# Altium PCB DC-Motor-Driver-v2.0.PcbDoc (part 4 of 5)
Units mil, origin at the board's own origin, x right, y up, seen from the top; angles counter-clockwise.
Board outline 3074 x 1810 mil, 4 copper layers (Top Layer, Signal 1, Signal 2, Bottom Layer), stack 62.055 mil thick; 232 components, 182 nets, 976 pads, 361 vias.
Unrouted connection lines stored in the file: 36.
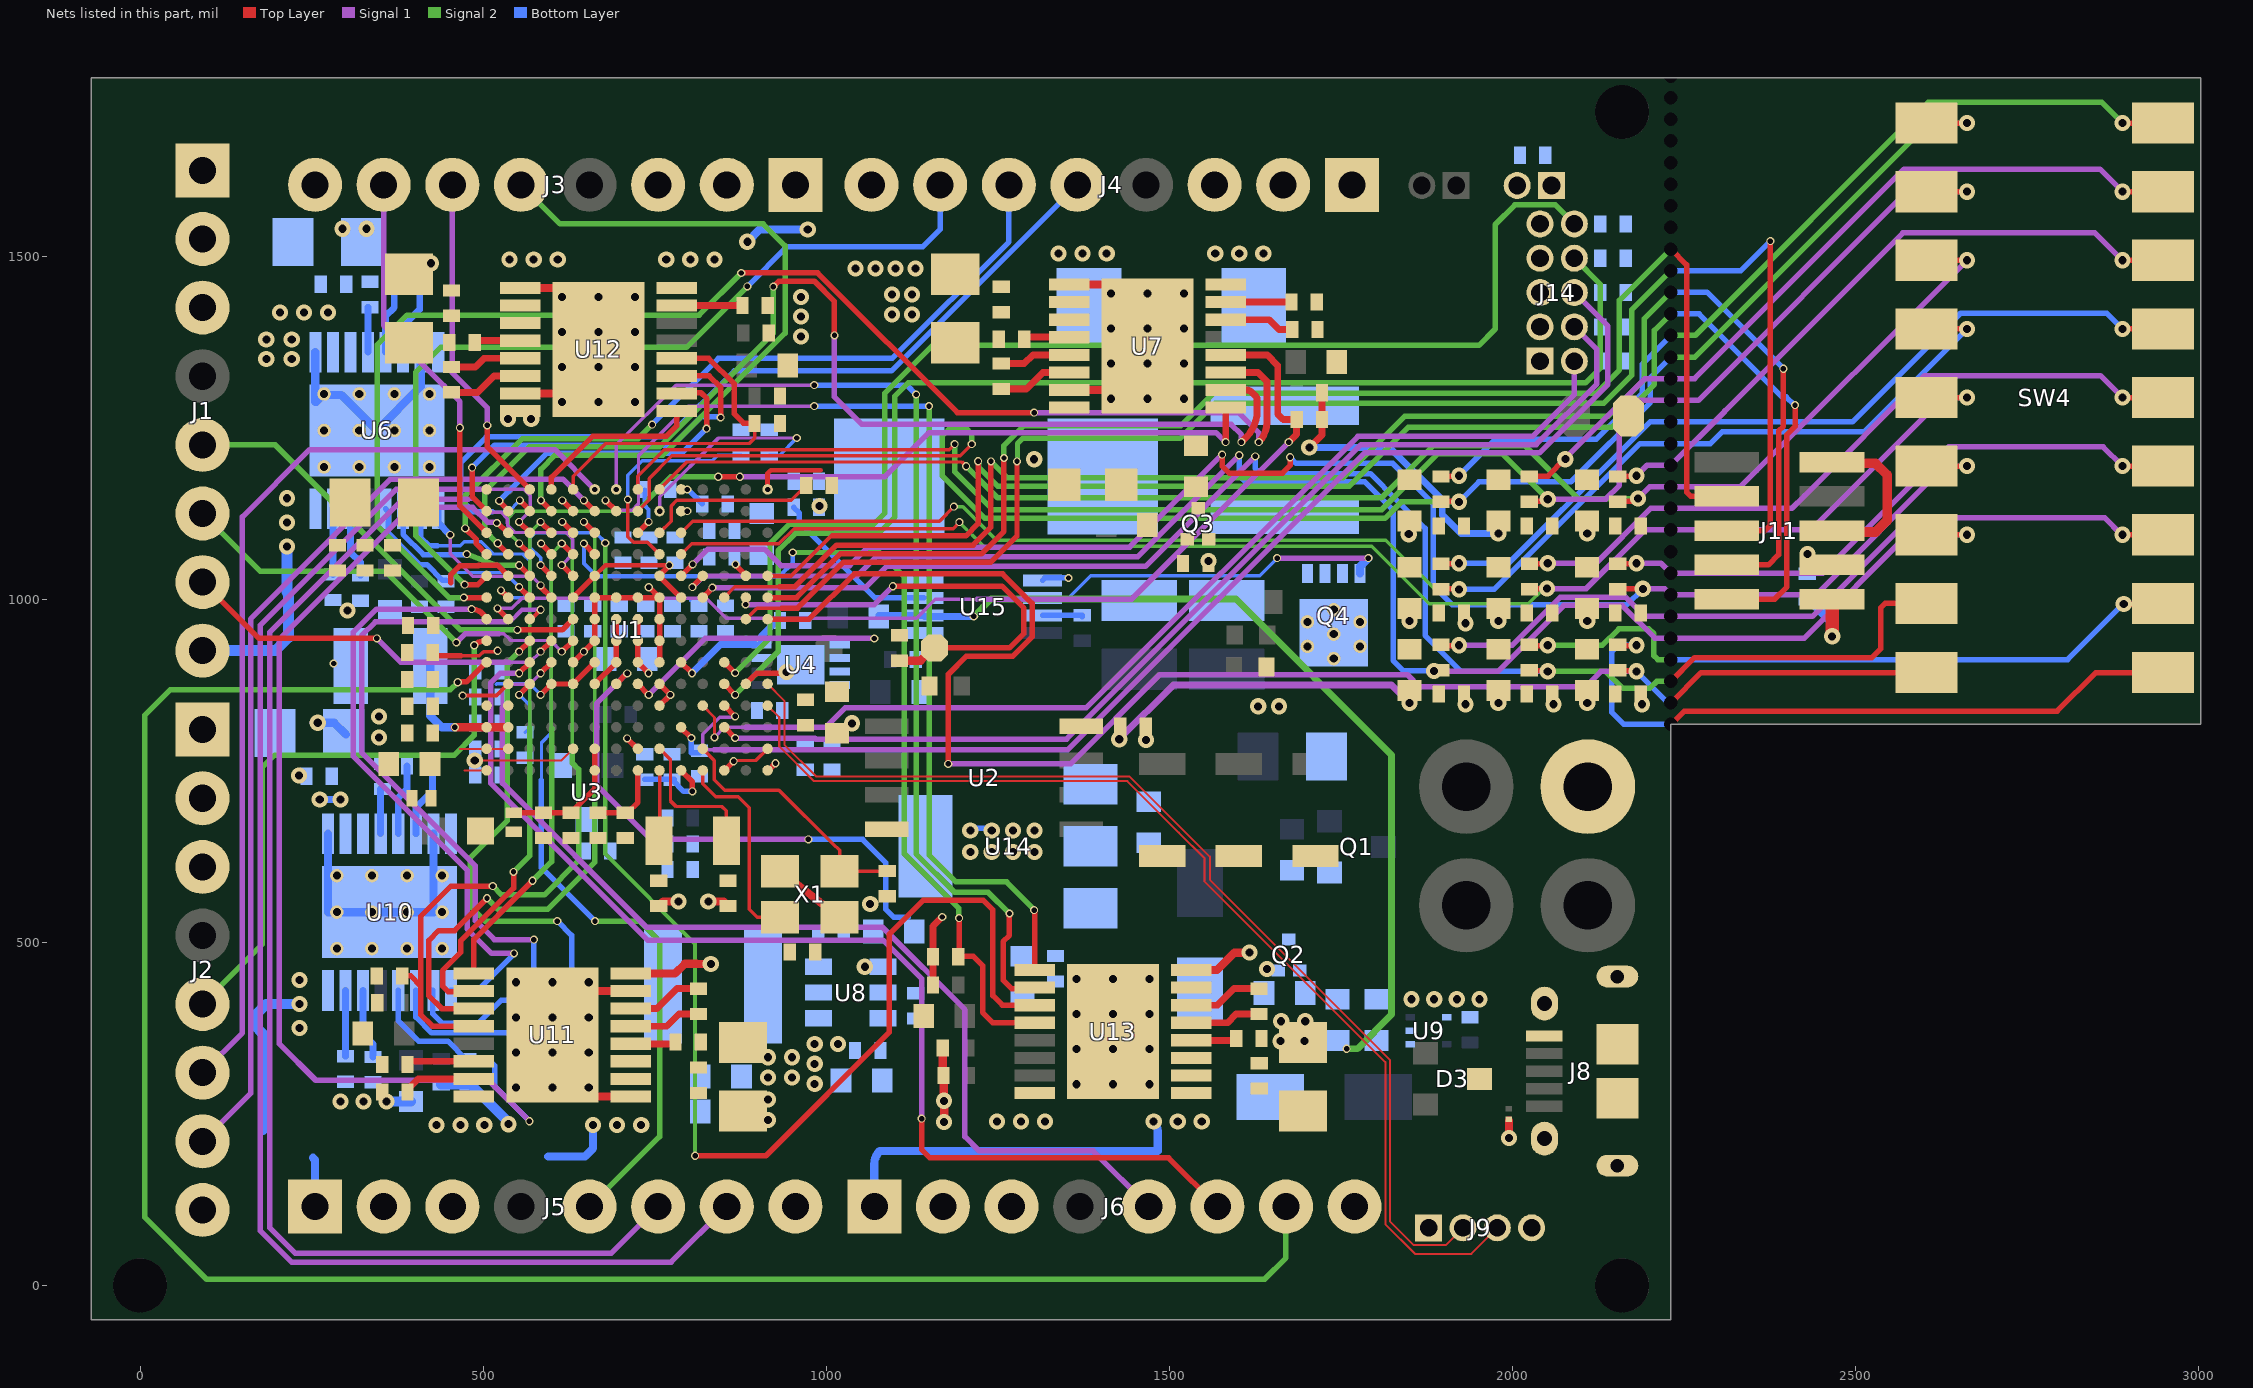
[diagram p4: the nets of this part, all layers, seen from the top]

## Part data (continued)
U6 U7 U10 U11 U12 U13: "DRV8874 H-BRIDGE MOTOR DRIVER", LCSC Part Number=C1855818, Manufacturer="Texas Instruments", Supplier Part Number=595-DRV8874PWPR, ComponentLink1Description=http://www.ti.com/general/docs/suppproductinfo.tsp?distId=10&amp;gotoUrl=http%3A%2F%2Fwww.ti.com%2Flit%2Fgpn%2Fdrv8874&src-supplier=Digikey, ComponentLink1URL=http://www.ti.com/general/docs/suppproductinfo.tsp?distId=10&amp;gotoUrl=http%3A%2F%2Fwww.ti.com%2Flit%2Fgpn%2Fdrv8874&src-supplier=Digikey, Height=1.2mm, Item Type=IC, Length=5mm, Manufacturer Part Number=DRV8874PWPR, Pricing="1=2.68, 10=2.4, 50=2.4, 100=1.93, 1000=1.31, 10000=1.22 (USD)", RoHS=Yes, Stock=13429, Supplier=Mouser, Thickness=1mm, Width=4.4mm
U8: "IC REG BUCK 3.3V 2A TSOT26", LCSC Part Number=C780769, Manufacturer=Diodes, Supplier Part Number=6109504, Category="Voltage Regulators - Switching", ComponentLink1Description=https://www.diodes.com/assets/Datasheets/AP63200-AP63201-AP63203-AP63205.pdf?src-supplier=Digi-Key, ComponentLink1URL=https://www.diodes.com/assets/Datasheets/AP63200-AP63201-AP63203-AP63205.pdf?src-supplier=Digi-Key, Item Type=IC, Manufacturer Part Number=AP63203WU-7, Pricing="3000=0.34, 6000=0.335, 9000=0.33, 12000=0.33, 15000=0.32 (USD)", RoHS=Yes, Stock=3000, Supplier="Future Electronics"
U9: "IC SUPERVISOR 1 CHANNEL 5VSOF", Case/Package=VSOF, LCSC Part Number=C509824, Manufacturer=Rohm, Max Operating Temperature=105°C, Max Power Dissipation=210mW, Max Reset Threshold Voltage=6.09V, Max Supply Current=1.98uA, Max Supply Voltage=10V, Min Operating Temperature=-40°C, Min Reset Threshold Voltage=5.91V, Min Supply Voltage=1.2V, Number of Voltages Monitored=1, Operating Supply Current=900nA, Package Quantity=3000, Supplier Part Number 1=BD4860FVE-CT-ND, Threshold Voltage=6V, Accuracy=1%, Category="Voltage Supervisors", ComponentLink1Description=https://datasheet.ciiva.com/1974/bd48xxg-e-1974994.pdf?src-supplier=Digi-Key, ComponentLink1URL=https://datasheet.ciiva.com/1974/bd48xxg-e-1974994.pdf?src-supplier=Digi-Key, ComponentLink2Description=https://datasheet.ciiva.com/8133/bd48xxg-e-8133113.pdf?src-supplier=Avnet, ComponentLink2URL=https://datasheet.ciiva.com/8133/bd48xxg-e-8133113.pdf?src-supplier=Avnet, Item Type=IC, Lead Free="Lead Free", Manufacturer Part Number=BD4860FVE-TR, Mounting Technology="Surface Mount", Number of Monitored Inputs=1, Packaging="Tape and Reel", Pins=5, Pricing 1="1=0.64000, 10=0.54900, 25=0.51200, 100=0.40960, 250=0.38032, 500=0.32182, 1000=0.24868 (USD)", Reset="Active Low", RoHS=Yes, RoHS Compliant=Yes, Series=BD48xxx, Stock 1=5990, Supplier 1=Digi-Key, Type="Simple Reset/Power-On Reset,Voltage Detector", Watchdog Timer=No
U14: "15V 1.3V @ 800mA Fixed 3.3V SOT-223 Linear Voltage Regulators (LDO) ROHS", LCSC Part Number=C92102, Manufacturer="Diodes Incorporated", Package=SOT-223, ComponentLink1Description=LCSC, ComponentLink1URL=https://lcsc.com/product-detail/Linear-Voltage-Regulators-LDO_Diodes-Incorporated-AZ1117CH-3-3TRG1_C92102.html, Item Type=IC, Manufacturer Part Number=AZ1117CH-3.3TRG1
U15: "IC REG CTRLR BUCK 8VSSOP", LCSC Part Number=C66537, Manufacturer="TI National Semiconductor", Supplier Part Number=926-LM25085MM/NOPB, ComponentLink1Description=https://datasheet.ciiva.com/6598/lm25085-6598301.pdf?src-supplier=Digikey, ComponentLink1URL=https://datasheet.ciiva.com/6598/lm25085-6598301.pdf?src-supplier=Digikey, ComponentLink2Description=https://datasheet.ciiva.com/6598/lm25085-6598310.pdf?src-supplier=Digikey, ComponentLink2URL=https://datasheet.ciiva.com/6598/lm25085-6598310.pdf?src-supplier=Digikey, Item Type=IC, Manufacturer Part Number=LM25085MM/NOPB, Pricing="1=2.42, 10=2.06, 50=2.06, 100=1.75, 1000=1.1, 10000=1.03 (USD)", RoHS=Yes, Stock=2383, Supplier=Mouser
X1: library part X322524MOB4SI, "24MHz SMD Crystal Resonator 12pF ±10ppm ±30ppm -40℃~+85℃ SMD3225-4P Crystals ROHS", LCSC Part Number=C70590, Manufacturer="Yangxing Tech", ComponentLink1Description=LCSC, ComponentLink1URL=https://www.lcsc.com/product-detail/Crystals_Yangxing-Tech-X322524MOB4SI_C70590.html, Item Type=Crystal, Manufacturer Part Number=X322524MOB4SI
X2: library part NX3215SA-32.768K-STD-MUA-8, "CRYSTAL 32.7680KHZ 12.5PF SMD", Case/Package=SMD/SMT, ESR (Equivalent Series Resistance)=70kR, Frequency=32.768kHz, Frequency Tolerance=20ppm, LCSC Part Number=C156245, Load Capacitance=12.5pF, Manufacturer=NDK, Max Operating Temperature=85°C, Min Operating Temperature=-40°C, Package Quantity=1000, Supplier Part Number 1=644-1156-6-ND, ComponentLink1Description=https://media.digikey.com/pdf/Data%20Sheets/NDK%20PDFs/NX3215SA-32.768K-STD-MUA-8.pdf?src-supplier=Digi-Key, ComponentLink1URL=https://media.digikey.com/pdf/Data%20Sheets/NDK%20PDFs/NX3215SA-32.768K-STD-MUA-8.pdf?src-supplier=Digi-Key, ComponentLink2Description=http://www.ndk.com/images/products/catalog/c_NX3215SA-STD-MUA-14_e.pdf?src-supplier=Digi-Key, ComponentLink2URL=http://www.ndk.com/images/products/catalog/c_NX3215SA-STD-MUA-14_e.pdf?src-supplier=Digi-Key, Height=0.035inch, Lead Free="Lead Free", Length=0.126inch, Manufacturer Part Number=NX3215SA-32.768K-STD-MUA-8, Mount="Surface Mount", Number of Pins=2, Packaging="Tape and Reel", Pricing 1="1=0.68, 10=0.602, 50=0.5628, 100=0.4974, 500=0.47124, 1000=0.3927 (USD)", Stock 1=29951, Supplier 1=Digi-Key, Width=0.059inch

## Free pads (board coordinates)
  round 78.74 hole 78.74 unplated: MH(0,0) MH(2160,0) MH(2160,1710)
  round 0 hole 19.68: ""(2231,817.54) ""(2231,849.03) ""(2231,880.53) ""(2231,912.02) ""(2231,943.52) ""(2231,975.02) ""(2231,1006.51) ""(2231,1038.01) ""(2231,1069.5) ""(2231,1101) ""(2231,1132.5) ""(2231,1163.99) ""(2231,1195.49) ""(2231,1226.98) ""(2231,1258.48) ""(2231,1289.98) ""(2231,1321.47) ""(2231,1352.97) ""(2231,1384.46) ""(2231,1415.96) ""(2231,1447.46) ""(2231,1478.95) ""(2231,1510.45) ""(2231,1541.94) ""(2231,1573.44) ""(2231,1604.94) ""(2231,1636.43) ""(2231,1667.93)
  round 0 hole 19.68 unplated: ""(2231,1699.43) ""(2231,1730.92) ""(2231,1762.42)

## Via types
v1: diameter 23.62, hole 11.81, Top Layer to Bottom Layer, tented both sides, 182 vias
v2: diameter 11.81, hole 7.87, Top Layer to Bottom Layer, tented both sides, 179 vias

## Nets (pads, with @x,y where several pads share a name; then routed paths per layer and width w, separated by ;. In a path a pad name is that pad's centre, name@x,y a point inside that pad or via, vN(x,y) a via of type N, cw(c..) or ccw(c..) an arc to the next point about the centre after c; other vN are vias at no path point)
1: pad.@2231,1384.46 R60.1 R62.2 SW4.18 | length 1314.8
  Top Layer w8: R62.2@1896,1179.5 1921.5,1179.5 v1(1922,1180) ; v1(2889,1694) SW4.18@2948,1694
  Signal 2 w8: pad.@2231,1384.46 2266.46,1384.46 2606,1724 2859,1724 v1(2889,1694)
  Bottom Layer w8: v1(1922,1180) 1975,1233 2122,1233 2189,1300 2189,1342.46 pad.@2231,1384.46
2: pad.@2231,1321.47 R59.1 R64.2 SW4.17 | length 1124.3
  Top Layer w8: R64.2@2024.5,1179 2052.26,1179 2052.26,1180.26 2076.19,1204.19 v1(2077.11,1204.19) ; v1(2889,1594) SW4.17@2948,1594
  Signal 1 w8: v1(2077.11,1204.19) 2077.11,1205.61 2192.97,1321.47 pad.@2231,1321.47 2265.47,1321.47 2571,1627 2856,1627 v1(2889,1594)
3: pad.@2231,1195.49 R58.1 R66.2 SW4.16 | length 956.7
  Top Layer w8: R66.2@2155,1179.5 2180.5,1179.5 v1(2181,1180) ; v1(2889,1494) SW4.16@2948,1494
  Signal 1 w8: v1(2181,1180) 2196.49,1195.49 pad.@2231,1195.49 2309.5,1273.99 2309.5,1274.41 2569.09,1534 2849,1534 v1(2889,1494)
3V3: C8.2 C9.2 C10.2 C11.2 C12.2 C13.2 C14.2 C15.2 C16.2 C17.2 C18.2 C19.2 C20.2 C21.2 C22.2 C23.2 C47.2 C48.2 C49.2 C61.2 C62.2 C90.2 C91.2 C92.2 FB2.1 J1.3 J2.3 J3.3 J4.3 J5.3 J6.3 J9.1 J11.1 J13.1 L2.2 LED1.1 pad.@2231,1541.94 pad.@2231,1573.44 pad.@2231,1604.94 R2.1 R7.2 R12.2 R21.2 R22.2 R37.2 R38.2 R46.1 R47.1 R48.1 R49.1 R50.1 R51.1 R52.2 R53.2 R54.2 R55.2 R56.2 R57.2 R58.2 R59.2 R60.2 U1.E6 U1.E9 U1.F5 U1.F10 U1.J6 U1.J10 U1.K4 U1.K5 U1.N14 U1.P12 U2.8 U3.3 U4.8 U6.16 U7.16 U8.1 U10.16 U11.16 U12.16 U13.16 | length 2316.3
  Top Layer w5: 467,917.59 494.49,917.59 500.49,923.59 519.7,923.59 v2(521,924.9) ; v2(865,763.94) 865,765 897.52,765 U1.N14@914.53,782.01
  Top Layer w6: U1.E6@662.49,1034.05 677.94,1049.5 v2(771.41,1049.5)
  Top Layer w8: C23.2@426.58,922.43 431.41,917.59 467,917.59 ; v2(583.78,860.75) 583.78,860.8 599.48,876.5 631.06,876.5 U1.J6@662.56,907.99 ; U1.F5@630.94,1002.89 U1.E6@662.1,1034.05 ; U1.E9@756.98,1033.51 U1.F10@787.94,1002.55 ; U1.E9@756.98,1034.05 757.36,1034.29 757.36,1035.45 v2(771.41,1049.5) ; U1.J10@788.54,907.99 v2(804.29,892.24) ; U1.P12@851.99,750.51 865,763.52 v2(865,763.94)
  Top Layer w10: R38.2@1155.5,438 R50.1@1155.5,479 1155.5,523.5 v2(1169,537) ; v1(1704,1221) 1722.5,1239.5 R47.1@1722.5,1262 R12.2@1722.5,1301
  Top Layer w12: U11.16@714.97,454.57 779.57,454.57 793.78,468.78 810.97,468.78 811.18,468.57 v1(831.81,468.57) ; U13.16@1531.97,459.57 1569.57,459.57 1595,485 v1(1617,485)
  Top Layer w14: U12.16@553.83,1274.43 556,1274.43 U12.16@556,1273
  Top Layer w20: v1(2466,946) J11.1@2466,1000
  Signal 1 w10: v1(1427,796) 1506,875 1824,875 v1(1850,849)
  Bottom Layer w5: 519,876 519.84,876.84 567.69,876.84 v2(583.78,860.75)
  Bottom Layer w10: R49.1@478,293 R49.1@481.5,293 ; v1(537,235) v1@537,237.5 ; v2(804.29,892.24) 846.07,934.03 U4.8@897.06,934.03 ; U4.8@905.69,934.03 905.69,946.71 C91.2@931.17,972.2 ; v1(1704,1221) 1821.19,1221 1897.81,1144.38 1897.81,1123 1924.81,1096 v1(1979.5,1096) ; C47.2@2429.77,1000 C47.2@2433.27,1000
  Bottom Layer w12: v1(885,1521) 903,1539 v1(973,1539)
  Bottom Layer w15: R21.2@439,293 R49.1@478,293 ; R49.1@481.5,293 v1@537,237.5 ; C47.2@2433.27,1000 2466,967.27 v1(2466,946)
  other v1: 1056.23,464.42 1979.5,849 2109,849 2109,968.19 1850,968.5 1979.5,968.5 1848.86,1094.86 2109,1096 1303,1204 536.13,1262.81 570,1262.81
3V3_ENABLE: R8.1 R11.2 U1.K7 U8.2 | length 777.3
  Top Layer w8: U1.K7@694.06,876.45 v2@709.8,892.2
  Signal 1 w8: v2@709.78,892.22 665.45,847.89 665.45,729.3 744.75,650 v2(974,650)
  Bottom Layer w8: v2(974,650) 1053,650 1086.63,616.37 1086.63,576.63 1086.81,576.45 1086.81,548.19 1098.5,536.5 1119.5,536.5
  other v2: 710,892
3V3_LDO: C82.2 D1.1 U14.2 U14.4 | length 28.8
  Bottom Layer w8: v1@1210,666 1236,666 v1@1238,664
  other v1: 1210,631.81 1241.14,631.81 1272.29,631.81 1303.43,631.81 1210,663 1241.14,663 1272.29,663 1303.43,663 1629.5,844 1660,844
4: pad.@2231,1258.48 R57.1 R68.2 SW4.15 | length 1213.2
  Top Layer w8: R68.2@1896,1052 1921.5,1052 v1(1922,1052.5) ; v1(2889,1394) SW4.15@2948,1394
  Bottom Layer w8: v1(1922,1052.5) 1994.53,1052.5 2154.03,1212 2200.51,1258.48 pad.@2231,1258.48 2495.48,1258.48 2639.69,1402.69 2639.69,1403.45 2653.05,1416.81 2653.81,1416.81 2654,1417 2866,1417 v1(2889,1394)
5: pad.@2231,1132.5 R56.1 R70.2 SW4.14 | length 1049.2
  Top Layer w8: R70.2@2025.5,1052 2051,1052 v1(2051.5,1052.5) ; v1(2889,1294) SW4.14@2948,1294
  Signal 1 w8: v1(2051.5,1052.5) 2121.5,1052.5 2201.5,1132.5 pad.@2231,1132.5 2386.79,1132.5 2407.11,1132.5 2425.35,1150.74 2600.62,1326 2857,1326 v1(2889,1294)
6: pad.@2231,1038.01 R55.1 R72.2 SW4.13 | length 887
  Top Layer w8: R72.2@2155,1052 2180.5,1052 v1(2181,1052.5) ; v1(2889,1194) SW4.13@2948,1194
  Signal 1 w8: v1(2181,1052.5) 2216.51,1052.5 pad.@2231,1038.01 2452.01,1038.01 2636,1222 2861,1222 v1(2889,1194)
6V: C50.1 C51.1 C52.2 C53.2 C56.1 C57.1 C65.1 C66.1 C67.2 C68.2 C71.1 C72.1 C73.1 C74.1 C75.2 C76.2 C79.1 C80.1 C88.2 C89.1 J14.1 J14.3 J14.5 J14.7 J14.9 L3.2 R44.1 U6.11 U7.11 U10.11 U11.11 U12.11 U13.11 | length 54
  Bottom Layer w12: v1@253,820 282.99,820 C65.1@299.99,803
  other v1: 915,302.92 950,302.92 915,332.5 950,332.5 1662,356 1697.08,356 1663,385 1698.08,385 347.99,798.5 259,820 347.99,829 990,1136 184,1350 221.08,1350 184,1378.5 221.08,1378.5 1096,1415 1125.08,1415 1096,1444 1125.08,1444 295,1540 330.08,1540
7: pad.@2231,975.02 R54.1 R74.2 SW4.12 | length 1161.8
  Top Layer w8: R74.2@1896,932.5 1921.5,932.5 v1(1922,933) ; v1(2889,1094) SW4.12@2948,1094
  Signal 1 w8: v1(1922,933) 2000.03,933 2070.03,1003 2165,1003 2192.98,975.02 2437.02,975.02 2581,1119 2863,1119 v1@2888,1094
8: pad.@2231,912.02 R53.1 R76.2 SW4.11 | length 1004
  Top Layer w8: R76.2@2025.5,932.5 2051,932.5 v1(2051.5,933) ; v1(2891,993) 2947,993 SW4.11@2948,994
  Signal 2 w8: v1(2051.5,933) 2131,933 2155,957 2199,957 2206,950 2206,918 2211.98,912.02 pad.@2231,912.02
  Bottom Layer w8: pad.@2231,912.02 2809.02,912.02 2890,993 v1(2891,993)
9: pad.@2231,817.54 R52.1 R78.2 SW4.10 | length 996.5
  Top Layer w8: R78.2@2155,932.5 2180.5,932.5 v1(2181,933) ; pad.@2231,817.54 2250.46,837 2794,837 2850.2,893.2 SW4.10@2948,893.2
  Bottom Layer w8: v1(2181,933) 2154,933 2145,924 2145,835 2162.46,817.54 pad.@2231,817.54
BUCK_EN: C64.2 R10.1 R42.1 U9.1 U15.2 | length 1316.9
  Signal 2 w10: v2(1215,975) 1240.14,1000.14 1596.86,1000.14 1824,773 1824,395 1773.91,344.91 v2(1758.43,344.91)
  Bottom Layer w10: R42.1@1076.54,976.41 U15.2@1142,976.41 1143.41,975 v2(1215,975)
BUCKIN: C59.2 C60.2 C83.2 C84.2 D2.1 D5.1 R8.2 U8.3 U14.3
ENABLE_1: U1.E3 U6.3 | length 243.9
  Top Layer w8: v2(552.32,1049.59) 552.39,1049.66 U1.E3@568,1034.05
  Signal 2 w8: v2(476.14,1065.86) 518.43,1049.59 v2(552.32,1049.59)
  Bottom Layer w8: U6.3@383.39,1131.83 383.39,1094.61 412.87,1065.13 436.1,1065.13 464.62,1065.13 475.41,1065.13 v2(476.14,1065.86)
ENABLE_2: U1.H3 U10.3 | length 996.4
  Top Layer w8: v2(552.32,923.74) U1.H3@568.07,939.49
  Signal 2 w8: v2(552.32,923.74) 535,906.42 535,677 481,623 481,553 503,531 v2(608,531)
  Bottom Layer w8: U10.3@401.89,429.83 401.89,391.11 425,368 613,368 629,384 629,510 v2(608,531)
ENABLE_3: U1.B1 U12.3 | length 579.7
  Top Layer w8: v2(484,1191.91) 484,1158.87 484.04,1158.83 484.04,1149.51 U1.B1@505.01,1128.54 ; U12.3@782.17,1325.61 829.39,1325.61 845.98,1309.02 v2(845.98,1264.91)
  Bottom Layer w8: v2(484,1191.91) 516.59,1224.5 654.49,1224.5 776.34,1224.5 817.48,1265.64 833.46,1265.64 845.25,1265.64 v2(845.98,1264.91)
ENABLE_4: U1.F1 U7.3 | length 2061.4
  Top Layer w3: U1.F1@505.01,1002.55 U1.F1@505.08,1002.48
  Top Layer w8: v2(472,1002.55) U1.F1@505.01,1002.55 ; v2(876.12,1475.51) 987.49,1475.51 1191.09,1271.91 1249.44,1271.91 v2(1303,1271.91)
  Top Layer w10: U7.3@1582.17,1330.61 1629.14,1330.61 1642.09,1317.66 1642.09,1257.48 cw(c1601.76,1257.48) v2(1630.28,1228.96)
  Signal 1 w8: v2(1303,1271.91) 1601.09,1271.91 1630.24,1242.76 1630.24,1229 v2(1630.28,1228.96)
  Signal 2 w8: v2(472,1002.55) 450.27,1002.55 426.91,1025.91 346,1106.82 346,1371 389.23,1414.23 814.84,1414.23 v2(876.12,1475.51)
ENABLE_5: U1.C6 U11.3 | length 981.4
  Top Layer w8: U11.3@486.63,403.39 439.66,403.39 421,422.04 421,503 435,517 458.31,517 v2(505.56,564.25) ; v2(646.81,1112.72) U1.C6@662.56,1096.97
  Signal 2 w5: v2(646.81,1112.72) 662.5,1097.03 662.5,778
  Signal 2 w8: v2(505.56,564.25) 521.91,547.91 549.06,547.91 593.91,547.91 662.5,616.5 662.5,778
ENABLE_6: U1.E4 U13.3 | length 2004.4
  Top Layer w8: v2(583.78,1049.72) U1.E4@599.5,1034.05 ; v2(809,189) 912,189 1092.04,369.04 1092.04,512.04 1141,561 1229,561 1242.8,547.2 1242.8,422.24 1256.66,408.39 U13.3@1303.63,408.39
  Signal 2 w6: v2(678,1082) 678,628.49 809,497.49 v2(809,189)
  Bottom Layer w5: v2(583.78,1049.72) 583.78,1060.22 568,1076 568,1089 575.63,1096.63 664.37,1096.63 v2@679,1082
FAULT_1: R46.2 U1.F3 U6.4 | length 291.9
  Top Layer w8: v2(552.32,1017.86) 552.5,1017.86 567.89,1002.48 U1.F3@568.07,1002.48
  Bottom Layer w5: R46.2@446,1026 449.5,1026 462.5,1039 531.19,1039 v2(552.32,1017.86)
  Bottom Layer w8: U6.4@357.8,1131.83 361.66,1127.96 361.66,1096.34 394,1064 407.5,1050.5 418,1050.5 441,1027.5 R46.2@445.38,1027.5
FAULT_2: R49.2 U1.C2 U10.4 | length 1741.6
  Top Layer w3: U1.C2@536.5,1097.04 U1.C2@536.57,1096.97
  Top Layer w8: v2(519.94,1111.2) 520.97,1111.2 U1.C2@535.14,1097.04
  Signal 1 w8: v2(519.94,1111.2) 519.21,1111.93 506.76,1111.93 484.69,1134 395,1134 203,942 203,352 256,299 507.64,299 v2(567.31,239.33)
  Bottom Layer w8: U10.4@376.3,429.83 376.3,385.7 406,356 448.5,356 474.5,330 507,330 517,320 517,289.64 v2(567.31,239.33)
FAULT_3: R51.2 U1.A5 U12.4 | length 505.1
  Top Layer w5: U1.A5@631.06,1159.96 631.06,1179.27 678.8,1227 888,1227 896,1235 R51.2@896,1254
  Top Layer w8: U12.4@782.17,1351.2 828.57,1351.2 866,1313.77 866,1270 879.19,1256.81 892.19,1256.81 R51.2@895,1254
FAULT_4: R47.2 U1.G2 U7.4 | length 1520.8
  Top Layer w8: v2(520.83,986.73) U1.G2@536.5,971.06
  Top Layer w10: U7.4@1582.17,1356.2 1642.8,1356.2 1658,1341 1658,1270 1666,1262 R47.2@1685.5,1262 1685.5,1240.42 v2@1674.05,1228.97
  Signal 1 w5: v2(520.83,986.73) 541.73,986.73 556.59,1001.59 825.41,1001.59 854.5,972.5 1131.5,972.5 1159.14,1000.14 1220,1000.14
  Signal 1 w8: 1220,1000.14 1445.22,1000.14 v2@1673.55,1228.47
  other v2: 1674.05,1228.96
FAULT_5: R48.2 U1.C5 U11.4 | length 1060.7
  Top Layer w8: R48.2@382,451 394.5,451 409,436.5 ; U11.4@486.63,377.8 426,377.8 409,394.8 409,436.5 ; v2(514,582) 453.04,582 409,537.96 409,436.5 ; v2(615.32,1112.72) U1.C5@630.99,1097.04
  Signal 2 w5: v2(615.32,1112.72) 630,1098.03 630,780.94
  Signal 2 w8: v2(514,582) 526.73,569.27 589.3,569.27 639,618.97 639,752 630,761 630,780.94
FAULT_6: R50.2 U1.D6 U13.4 | length 1342.8
  Top Layer w8: v2(646.81,1081.22) U1.D6@662.49,1065.54 ; v2(1193.66,535.26) 1193.66,480.16 R50.2@1192.5,479 1192.75,479.25 1193.5,480 1214,480 1227.8,466.2 1227.8,398 1243,382.8 U13.4@1303.63,382.8
  Signal 2 w8: v2(951.16,1068.15) 1008.18,1068.15 1077.88,1068.15 1113.91,1032.13 1113.91,629.09 1193,550 1193,535.31 1193.61,535.31 v2(1193.66,535.26)
  Bottom Layer w6: v2(646.81,1081.22) 646.81,1052.19 665.41,1033.59 797.1,1033.59 931.59,1033.59 951.16,1053.16 v2(951.16,1068.15)
FB: C88.1 R44.2 R45.2 U15.3 | length 252.1
  Bottom Layer w8: R44.2@952.5,1134 961,1125.5 961,1112 1071,1002 U15.3@1142,1002
FSR1: J14.2 R31.2 U1.L11 | length 1561.9
  Top Layer w4: U1.L11@820.04,845 837.2,827.84 v2(837.2,798.74)
  Signal 1 w5: v2@837.2,799.17 851.54,813.5 883,813.5
  Signal 1 w8: 883,813.5 999.55,813.5 1028.05,842 1379.26,842 1774.69,1237.43 2029.49,1237.43 2090.2,1298.14 J14.2@2090.2,1347
FSR2: J14.4 R30.2 U1.M12 | length 1589.7
  Top Layer w8: U1.M12@851.54,813.5 v2(867.28,797.76)
  Signal 1 w8: v2(867.28,797.76) 983.36,797.76 984.93,796.19 1350.42,796.19 1779.66,1225.43 2034.46,1225.43 2123,1313.97 2123,1364.2 J14.4@2090.2,1397
FSR3: J14.6 R29.2 U1.L12 | length 1791.8
  Top Layer w8: U1.L12@851.54,845 v2(867.28,829.25)
  Signal 1 w5: 837,780.85 827.94,780.85 820,788.8 820,803.33 844.62,827.95 865.98,827.95 v2(867.28,829.25)
  Signal 1 w8: 837,780.85 1352.05,780.85 1784.63,1213.43 2039.43,1213.43 2139,1313 2139,1398.2 J14.6@2090.2,1447
FSR4: J14.8 R28.2 U1.K12 | length 1845.7
  Top Layer w8: U1.K12@851.54,876.5 v2(867.28,860.75)
  Signal 2 w8: v2(867.28,860.75) 930.03,923.49 930.03,1069 930.03,1070.93 954.99,1095.88 1075.88,1095.88 1100,1120 1100,1296 1119.31,1315.31 2106.34,1315.31 2128.31,1337.28 2128.31,1458.89 J14.8@2090.2,1497
FSR5: J14.10 R27.2 U1.J12 | length 1811.3
  Top Layer w3: U1.J12@851.54,907.99 U1.J12@851.69,907.99 ; v2@867.13,892.56 v2(867.28,892.56)
  Top Layer w8: U1.J12@851.69,907.99 v2@867.13,892.56
  Signal 2 w8: v2(867.28,892.56) 918.03,943.3 918.03,1081 946.03,1109 1069,1109 1085,1125 1085,1300 1155,1370 1951,1370 1975,1394 1975,1546 2003.69,1574.68 2062.52,1574.68 J14.10@2090.2,1547
GND: C1.1 C2.1 C3.1 C4.1 C5.1 C6.1 C7.1 C8.1 C9.1 C10.1 C11.1 C12.1 C13.1 C14.1 C15.1 C16.1 C17.1 C18.1 C19.1 C20.1 C21.1 C22.1 C23.1 C24.1 C25.2 C26.1 C27.1 C28.1 C29.2 C30.1 C31.1 C32.1 C33.1 C34.1 C35.1 C36.1 C37.1 C38.1 C39.2 C40.2 C41.1 C42.2 C43.2 C44.1 C45.1 C46.1 C47.1 C48.1 C49.1 C50.2 C51.2 C52.1 C53.1 C59.1 C60.1 C61.1 C62.1 C63.1 C64.1 C65.2 C66.2 C67.1 C68.1 C73.2 C74.2 C75.1 C76.1 C82.1 C83.1 C84.1 C86.1 C87.1 C89.2 C90.1 C91.1 C92.1 D3.3 D4.1 D8.2 J1.2 J2.2 J3.2 J4.2 J5.2 J6.2 J7.2 J8.5 J8.MP1 J8.MP2 J8.S1 J8.S2 J8.S3 J8.S4 J9.4 J11.3 J11.5 J11.9 J13.2 pad.@2231,1636.43 pad.@2231,1667.93 Q2.2 Q3.2 R3.2 R4.2 R5.2 R6.2 R11.1 R13.1 R14.1 R15.2 R16.2 R17.2 R18.1 R19.2 R23.1 R24.1 R27.1 R28.1 R29.1 R30.1 R31.1 R32.2 R33.2 R34.2 R35.2 R36.2 R39.1 R40.1 R45.1 R61.1 R63.1 R65.1 R67.1 R69.1 R71.1 R73.1 R75.1 R77.1 R79.1 R80.1 R81.1 R82.1 R83.1 R84.2 SW1.2 SW2.2 SW3.2 TP1.2 U1.A1 U1.A14 U1.B5 U1.B10 U1.E2 U1.E13 U1.G7 U1.G8 U1.H7 U1.H8 U1.J7 U1.J8 U1.K2 U1.K6 U1.K9 U1.K13 U1.L9 U1.N1 U1.N2 U1.N5 U1.N8 U1.P1 U1.P14 U2.4 U3.1 U4.1 U4.2 U4.3 U4.4 U4.7 U4.9 U6.9 U6.15 U6.17 U7.9 U7.15 U7.17 U8.4 U9.2 U9.4 U10.9 U10.15 U10.17 U11.9 U11.15 U11.17 U12.9 U12.15 U12.17 U13.9 U13.15 U13.17 U14.1 U15.4 X1.2 X1.4 | length 3093.6
  Top Layer w3: 465.49,782.01 U1.N2@536.57,782.01 ; 472.89,750.51 U1.P1@505.08,750.51 ; v1(487.78,765) 614.06,765 U1.N5@631.06,782.01 ; U1.B10@788.47,1128.54 v2(797.47,1128.54)
  Top Layer w6: v2@470.09,857.67 472.17,859.75 519.69,859.75 U1.K2@536.5,876.57
  Top Layer w7: v2(914.46,1160.03) 914.46,1183.46 919,1188 992,1188
  Top Layer w8: 452.86,1023.86 452.86,1035.86 465.96,1048.96 493.01,1048.96 493.78,1049.72 520.83,1049.72 U1.E2@536.57,1033.98 ; U1.A1@504.92,1160.12 U1.A1@505.01,1160.03 ; v2(615.32,1144.21) U1.B5@631.06,1128.46 ; U1.K6@662.56,876.5 694.06,907.99 U1.G7@694.06,970.98 ; v2(709.8,797.17) U1.N8@725.55,781.42 ; U1.G8@725.55,970.98 725.55,907.99 725.55,907.82 740.96,892.42 v2(740.96,892.24) ; U1.L9@756.98,845.07 v2@772.72,860.82 ; U1.K9@757.05,876.5 v2(772.8,860.75) ; v2(867.77,1050.81) 867.77,1050.02 882.96,1034.83 U1.E13@882.96,1034.05 ; U1.K13@882.96,876.57 891.39,885 898.78,892.39 940.39,892.39 v1(942,894) ; U1.P14@914.98,750.51 915.51,750.51 v2(926,761)
  Top Layer w12: U12.15@553.83,1300.02 668,1300.02 U12.17@668,1338.41 U12.17@668,1364 U12.17@668,1389.59 U12.17@668,1440.77 668,1453.57 U12.9@553.83,1453.57 ; U11.17@600.8,365 664.78,428.98 U11.15@714.97,428.98 ; U11.17@632,275.43 U11.9@714.97,275.43 ; C42.2@756,553 762.35,559.35 v1(784.85,559.35) ; v1(828.15,559.35) 850.65,559.35 C43.2@857,553 ; X1.2@932.77,603.46 X1.4@1019.39,536.54 ; R36.2@1169.8,346 1169.8,306.02 1171.31,304.52 1171.31,269.51 v1(1171.81,269) v1(1171.81,238) ; U7.15@1353.83,1305.02 U7.17@1468,1305.02 ; U7.9@1353.83,1458.57 1468,1458.57 U7.17@1468,1445.77 ; v1@1995,213 D4.1@1995,240
  Top Layer w14: J11.5@2457,1098 2529.46,1098 2546,1114.54 2546,1181.46 2529.46,1198 J11.9@2457,1198
  Bottom Layer w12: U6.9@255.43,1360.17 255.43,1288 257.08,1288 U6.17@268.23,1299.15 ; U6.17@268.23,1297.73 293.27,1297.73 U6.17@345,1246 408.98,1309.98 U6.15@408.98,1360.17 ; U10.9@273.93,658.17 273.93,544 U10.17@286.73,544 U10.17@337.91,544 U10.17@363.5,544 U10.17@389.09,544 427.48,544 U10.15@427.48,658.17
  Bottom Layer w15: v1(359,268) R23.1@394.5,268
  other v1: 1995,215 915,241 292,268 325.5,268 915,271 983.16,293.84 983.16,322.92 983.16,352 1017,352 1853,417 1886,417 1919,417 1952,417 1642.49,461.04 1064,556 231.81,743 1466,794.88 1037.5,819.19 1931.5,847 2060,847 2189,847 1931.5,965 302.19,983.51 1557,1055.81 2430,1066 963,1382.84 963,1411.92 963,1440.7 1042.84,1482 1071.92,1482 1101,1482 1130.08,1482 424,1489.76
  other v2: 470.09,859.67
GPIO_AD_B0_04: pad.@2231,880.53 R75.2 R76.1 SW4.8 U1.F11 | length 2222
  Top Layer w8: U1.F11@819.97,1002.55 v2@830.42,1013 ; v2@831,1014 v2(834,1017) ; R76.1@2025.5,895.5 2051,895.5 v1(2051.5,895) ; pad.@2231,880.53 2265.47,915 2524,915 2537,928 2537,988 2543,994 SW4.8@2603.5,994
  Signal 1 w8: v2(834,1017) 1057,1017 1088,1048 1465,1048 v2(1625.15,1208.15)
  Signal 2 w8: v1(2051.5,895) 2136,895 2161,870 2200,870 2210.53,880.53 pad.@2231,880.53
  Bottom Layer w8: v2(1625.15,1208.15) 1625.15,1190.85 1633,1183 1792.99,1183 1831.76,1144.22 1872.81,1103.18 1872.81,947.19 1925,895 v1(2051.5,895)
GPIO_AD_B0_05: pad.@2231,849.03 R77.2 R78.1 SW4.9 U1.G14 | length 2314.9
  Top Layer w8: U1.G14@914.46,971.06 975.06,971.06 1041,1037 1257,1037 1300,994 1300,945.03 1271.97,917 1204.22,917 1177.81,890.59 v2(1177.81,760) ; R78.1@2155,895.5 2180.5,895.5 v1(2181,895) ; pad.@2231,849.03 2275.17,893.2 SW4.9@2603.5,893.2
  Signal 1 w8: v2(1177.81,760) 1356,760 1486,890 1847,890 1864.81,872.19 2106.19,872.19 2129,895 v1(2181,895)
  Bottom Layer w8: v1(2181,895) 2226.97,849.03 pad.@2231,849.03
GPIO_AD_B0_08: R84.1 TP2.1 U1.F13 | length 675.5
  Top Layer w8: v2(882.53,992.32) 882.96,992.75 U1.F13@882.96,1002.55 ; v2(1097,1019) 1256,1019 1288,987 1288,950 1267,929 TP2.1@1158,929 TP2.1@1156.13,929
  Top Layer w12: R84.1@1107,910.5 1137.63,910.5 TP2.1@1156.13,929
  Signal 1 w8: v2(882.53,992.32) 882.53,992.11 883,991.64 883.32,991.32 884.12,992.12 1070.12,992.12 v2(1097,1019)
GPIO_B0_04: R79.2 U1.C8 | length 71.9
  Top Layer w8: U1.C8@725.48,1097.04 v2(741.23,1112.79)
  Bottom Layer w6: R79.2@735.5,1160 735.5,1136.5 741.23,1130.77 v2(741.23,1112.79)
GPIO_B0_05: pad.@2231,1352.97 R61.2 R62.1 SW4.1 U1.B8 | length 2531.2
  Top Layer w5: U1.B8@725.48,1128.54 742,1145.06 742,1176 775,1209 1195,1209 v2(1212,1226)
  Top Layer w8: R62.1@1896,1142.5 1921.5,1142.5 v1(1922,1142) ; SW4.1@2603.5,1694 v1(2662.5,1694)
  Signal 2 w8: v2(1212,1226) 1212,1241 1206,1247 1178,1247 1169,1238 1169,1180.18 1231.18,1118 1814,1118 1838,1142 v1(1922,1142) ; pad.@2231,1352.97 2265.97,1352.97 2607,1694 v1(2662.5,1694)
  Bottom Layer w8: v1(1922,1142) 1951,1171 2085,1171 2201,1287 2201,1322.97 pad.@2231,1352.97
GPIO_B0_06: pad.@2231,1289.98 R63.2 R64.1 SW4.2 U1.A8 | length 2429.1
  Top Layer w5: U1.A8@725.48,1160.03 725.48,1179.48 764,1218 1179,1218 v2(1187,1226)
  Top Layer w8: R64.1@2025.5,1142.5 2051,1142.5 2051,1145.31 v1(2051.5,1145.81) ; SW4.2@2603.5,1594 v1(2662.5,1594)
  Signal 1 w8: v1(2051.5,1145.81) 2135.81,1145.81 2156,1166 2156,1261 2184.98,1289.98 pad.@2231,1289.98 2270.98,1289.98 2575,1594 v1(2662.5,1594)
  Signal 2 w8: v2(1187,1226) 1187,1186.09 1242.51,1130.58 1809.58,1130.58 1891,1212 1985.31,1212 v1(2051.5,1145.81)
GPIO_B0_07: pad.@2231,1163.99 R65.2 R66.1 SW4.3 U1.A9 | length 2241.7
  Top Layer w5: U1.A9@756.98,1160.03 796.94,1200 1197.82,1200 v2(1203.91,1193.91)
  Top Layer w8: R66.1@2155,1142.5 2177.5,1142.5 2182.84,1147.84 v1@2184,1146.69 ; SW4.3@2603.5,1494 v1(2662.5,1494)
  Signal 1 w8: v1(2183,1146.69) 2200.3,1163.99 pad.@2231,1163.99 2332.49,1163.99 v1(2662.5,1494)
  Signal 2 w8: v2(1203.91,1193.91) 1249.86,1147.95 1809.19,1147.95 1885.24,1224 2018,1224 2095.31,1146.69 v1(2183,1146.69)
GPIO_B0_08: R80.2 U1.B9 | length 306.4
  Signal 1 w5: v2(757.13,1128.54) 757.6,1129 757.6,1149.6 843,1235 892.58,1235 v2(957,1235)
  Bottom Layer w5: R80.2@917,1210 932,1210 v2(957,1235)
GPIO_B0_09: R81.2 U1.C9 | length 255.4
  Top Layer w5: U1.C9@756.98,1097.04 773.94,1114 773.94,1135.94 782,1144 949,1144 R81.2@971,1166
GPIO_B0_10: R82.2 U1.D9 | length 323.6
  Top Layer w5: v2(711,1145.41) 711,1091 719.14,1082.86 731.35,1082.86 731.49,1083 739.52,1083 U1.D9@756.98,1065.54
  Bottom Layer w5: v2(711,1145.41) 711,1181 732,1202 834,1202 842,1210 R82.2@876,1210
GPIO_B0_11: R83.2 U1.A10 | length 38.7
  Top Layer w8: U1.A10@788.47,1160.03 v2(797.47,1160.03)
  Bottom Layer w8: v2@798.47,1160.03 R83.2@819.5,1139
GPIO_B0_12: pad.@2231,1226.98 R67.2 R68.1 SW4.4 U1.C10 | length 2182.4
  Top Layer w5: U1.C10@788.47,1097.04 805.43,1114 1165,1114 v2(1186,1135)
  Top Layer w8: R68.1@1896,1015 1921.5,1015 v1(1922,1014.5) ; SW4.4@2603.5,1394 v1(2662.5,1394)
  Signal 2 w5: v2(1186,1135) 1199.33,1135 1248.65,1085.69 1438.58,1085.69 1439.01,1086.12 1815.6,1086.12 1887.22,1014.5 v1(1922,1014.5)
  Bottom Layer w8: v1(1922,1014.5) 1973.5,1014.5 2185.98,1226.98 2288.55,1226.98 2305.45,1243.89 2512.39,1243.89 v1(2662.5,1394)
GPIO_B0_13: pad.@2231,1101 R69.2 R70.1 SW4.5 U1.D10 | length 2153.7
  Top Layer w5: U1.D10@788.47,1065.54 803.93,1081 931.07,1081 953.07,1103 1185,1103 1194,1112 v2(1194,1112.41)
  Top Layer w8: R70.1@2025.5,1015 v1@2050.38,1015 ; v1(2050.38,1015.61) v1@2050.38,1015 ; v1@2051,1015 v1@2050.38,1015 ; SW4.5@2603.5,1294 v1(2662.5,1294)
  Signal 1 w8: v1(2050.38,1015.61) 2107.61,1015.61 2193,1101 pad.@2231,1101 2435,1101 2628,1294 v1(2662.5,1294)
  Signal 2 w5: v2(1194,1112.41) 1229.54,1076.87 1231,1075.41 1235.14,1075.41 1319.17,1076.69 cw(c1319.25,1071.69) 1319.25,1076.69 1442.3,1076.69 1442.74,1077.12 1794.85,1077.12 1878.79,993.19 2022.92,993.19 2045.35,1015.61 v1(2050.38,1015.61)
GPIO_B0_14: pad.@2231,1006.51 R71.2 R72.1 SW4.6 U1.E10 | length 2349.6
  Top Layer w8: U1.E10@788.79,1036.05 790.41,1036.05 v2(805.18,1050.81) ; v2(1577,1210.87) 1577,1194 1587,1184 1665,1184 1676,1195 v2(1676,1207.01) ; R72.1@2155,1015 2180.5,1015 2184.69,1019.19 v1@2190.04,1019.19 ; SW4.6@2603.5,1194 v1(2662.5,1194)
  Signal 1 w8: v2(805.18,1050.81) 827.42,1073.06 909.97,1073.06 934.03,1049 1034,1049 1061,1076 1442.13,1076 v2(1577,1210.87) ; v1(2190.04,1015.19) 2222.32,1015.19 pad.@2231,1006.51 2442.51,1006.51 2630,1194 v1(2662.5,1194)
  Bottom Layer w8: v2(1676,1207.01) 1684.82,1198.19 1825.62,1198.19 1884.81,1138.99 1884.81,1019.43 1912.55,991.69 2166.54,991.69 v1(2190.04,1015.19)
GPIO_B0_15: pad.@2231,943.52 R73.2 R74.1 SW4.7 U1.E11 | length 2427.1
  Top Layer w8: v2(805,1017.69) 805,1018.38 819.97,1033.35 U1.E11@819.97,1034.05 ; v1(1885.79,895.5) R74.1@1896,895.5 ; SW4.7@2603.5,1094 v1(2662.5,1094)
  Signal 1 w8: v2(805,1017.69) 821.22,1033.91 1044.91,1033.91 1073,1062 1454,1062 v2(1601.84,1209.84) v2@1601.93,1209.93 ; v1(1885.79,895.5) 1885.79,895 1979,895 2075,991 2160.03,991 2207.51,943.52 pad.@2231,943.52 2425.35,943.52 2575.83,1094 v1(2662.5,1094)
  Bottom Layer w8: v2(1601.84,1209.84) 1601.84,1180.16 1611,1171 1785,1171 1826,1130 1826,911 1841.5,895.5 v1(1885.79,895.5)
JTAG_TCK/SWD_CLK: J11.4 pad.@2231,1447.46 U1.F12 | length 2257.9
  Top Layer w5: U1.F12@851.46,1002.55 866.87,1017.96 932.31,1017.96
  Top Layer w8: 932.31,1018 954,1018 1015,1079 1214,1079 1240,1105 1240,1199.12 1240.11,1199.24 v2(1240.11,1200.89) ; J11.4@2312.46,1050 2373,1050 2388.09,1065.09 2388.09,1245.07 2395,1251.97 v2(2395,1336)
  Signal 2 w8: v2(1240.11,1200.89) 1264.09,1176.91 1753.16,1176.91 1843.26,1267 2139.79,1267 2192,1319.21 2192,1408.46 pad.@2231,1447.46
  Bottom Layer w8: pad.@2231,1447.46 2283.54,1447.46 v2(2395,1336)
JTAG_TDI: J11.8 pad.@2231,1510.45 U1.F14 | length 2084.4
  Top Layer w8: U1.F14@914.53,1002.48 956.86,1002.48 1020.38,1066 1226,1066 1259,1099 v2(1259,1205.91) ; pad.@2231,1510.45 2254,1487.45 2254,1156 2260,1150 J11.8@2312.46,1150
  Signal 2 w8: v2(1259,1205.91) 1259,1223.97 1288.03,1253 1517,1253 1564,1300 2121.88,1300 2156,1334.12 2156,1435.45 pad.@2231,1510.45
JTAG_TDO: J11.6 pad.@2231,1478.95 U1.G13 | length 2336.4
  Top Layer w5: U1.G13@883.03,970.98 899.05,987 935,987
  Top Layer w8: 935,987 958.35,987 1025.35,1054 1239.97,1054 1278,1092.03 v2(1278,1201) ; J11.6@2312.46,1100 2368,1100 2376.09,1108.09 2376.09,1486 2376,1486.09 v2(2376,1522)
  Signal 2 w8: v2(1278,1201) 1278.73,1201.73 1278.73,1226.73 1287,1235 1516,1235 1567,1286 1829,1286 2133.33,1286 2174,1326.67 2174,1421.95 pad.@2231,1478.95
  Bottom Layer w8: pad.@2231,1478.95 2332.95,1478.95 v2(2376,1522)
JTAG_TMS/SWD_IO: J11.2 pad.@2231,1415.96 U1.E14 | length 2211
  Top Layer w6: U1.E14@914.46,1034.05 948.89,1033.89 1008.5,1093.5 1009,1093.5 1009,1092.5
  Top Layer w8: 1009,1092.5 1203.64,1092.5 1221.3,1110.17 v2(1221.3,1201.09) ; J11.2@2312.46,1000 2382,1000 2400.09,1018.09 2400.09,1240.09 2411.91,1251.91 v2(2411.91,1283)
  Signal 2 w8: v2(1221.3,1201.09) 1222.03,1200.36 1222.03,1192.76 1249.88,1164.91 1762.38,1164.91 1848.47,1251 2145,1251 2207,1313 2207,1391.96 pad.@2231,1415.96
  Bottom Layer w8: pad.@2231,1415.96 2272.04,1415.96 2392.96,1295.04 2398.84,1295.04 2410.87,1283 v2(2411.91,1283)
M1_A: J1.5 U1.G5 | length 658.2
  Top Layer w8: v2(549.76,955.31) 615.24,955.31 U1.G5@630.99,971.06
  Signal 2 w8: J1.5@91,1225 197,1225 466.69,955.31 v2(549.76,955.31)
M1_B: J1.6 U1.H5 | length 640.6
  Top Layer w8: v2(614.59,923.74) 614.88,923.74 630.59,939.44 U1.H5@630.99,939.44
  Signal 1 w5: 522.62,950 530,950 537,943 540.1,939.9 598.43,939.9 v2(614.59,923.74)
  Signal 1 w8: v2(461,937) 474,950 522.62,950
  Signal 2 w8: J1.6@91,1125 175,1041 357,1041 v2(461,937)
M1_Z: J1.7 U1.H4 | length 570.1
  Top Layer w8: J1.7@91,1025 173,943 v2(344.99,943) ; v2(583.78,923.74) 583.78,923.79 599.48,939.49 U1.H4@599.57,939.49
  Signal 1 w5: 538,907.99 568.07,907.99 v2(583.78,923.74)
  Signal 1 w8: v2(344.99,943) 380,907.99 538,907.99
M2_A: J2.5 U1.H1 | length 860.3
  Top Layer w8: v2(487,933) cw(c502.66,917.34) 502.66,939.49 U1.H1@505.08,939.49
  Signal 2 w8: J2.5@91,410 178,497 178,754.97 196.03,773 458,773 487,802 v2(487,933)
M2_B: J2.6 U1.A6 | length 1412.1
  Signal 1 w8: J2.6@91,310 149,368 149,1120 247,1218 604.52,1218 v2(662.49,1160.03)
M2_Z: J2.7 U1.B6 | length 1395.3
  Top Layer w8: v2(646.81,1144.21) U1.B6@662.56,1128.46
  Signal 1 w8: J2.7@91,210 161,280 161,971 365.01,1175.01 476.99,1175.01 616.02,1175 v2(646.81,1144.21)
M3_A: J3.5 U1.B4 | length 1054.1
  Top Layer w3: U1.B4@599.5,1128.54 U1.B4@599.57,1128.46
  Top Layer w8: v2(584.25,1144.21) 584.25,1143.99 599.5,1128.75 U1.B4@599.5,1128.54
  Signal 2 w8: J3.5@555,1604 612,1547 908,1547 940,1515 940,1388 809.28,1257.28 762,1210 605,1210 584.25,1189.25 v2(584.25,1144.21)
M3_B: J3.6 U1.A3 | length 490.9
  Top Layer w8: v2(506,1253.41) 506,1222.03 U1.A3@568.07,1159.96
  Signal 1 w8: J3.6@455,1604 455,1330 506,1279 v2(506,1253.41)
M3_Z: J3.7 U1.C1 | length 569.1
  Top Layer w8: v2(466,1250) 466,1136.05 U1.C1@505.01,1097.04
  Signal 1 w8: J3.7@355,1604 355,1399 443,1311 466,1288 v2(466,1250)
M4_A: J4.5 U1.B3 | length 1242.7
  Top Layer w8: v2(553.44,1144.21) 553.44,1143.65 568,1129.1 U1.B3@568,1128.54
  Bottom Layer w5: 513.21,1127.19 516.14,1127.19 516.25,1127.08 536.31,1127.08 v2(553.44,1144.21)
  Bottom Layer w8: 513.21,1127.19 485.81,1127.19 467.09,1145.91 467.09,1198.91 504.69,1236.5 637.09,1236.5 769.5,1236.5 866,1333 1095,1333 J4.5@1366,1604
M4_B: J4.6 U1.D1 | length 1126.7
  Top Layer w8: v2(473.91,1103.39) 490,1087.3 490,1080.55 U1.D1@505.01,1065.54
  Signal 2 w8: v2(473.91,1103.39) 473.91,1150.91 557,1234 725.77,1234 v2(746.18,1254.41)
  Bottom Layer w8: v2(746.18,1254.41) 842.77,1351 1096.03,1351 1266,1520.97 J4.6@1266,1604
M4_Z: J4.7 U1.E1 | length 1291.5
  Top Layer w8: v2@473.06,1021.32 492.28,1021.32 U1.E1@505.01,1034.05
  Signal 2 w8: v2(473.05,1021.33) 402,1092.38 402,1331 438,1367 796,1367 v2(885,1456)
  Bottom Layer w8: v2(885,1456) 943,1514 1141,1514 1166,1539 J4.7@1166,1604
M5_A: J5.5 U1.D4 | length 1150.9
  Top Layer w8: v2(584.57,1081.22) U1.D4@599.5,1066.29
  Signal 2 w8: J5.5@655,115 757,217 757,502 728,531 v2(663,531)
  Bottom Layer w5: v2(584.57,1081.22) 599.19,1066.6 599.19,917.36 599.22,917.32 599.22,805.22 585,791 585,735.94
  Bottom Layer w8: 585,735.94 585,609 v2(663,531)
M5_B: J5.6 U1.E5 | length 2097
  Top Layer w8: v2(614.59,1049.72) 614.95,1049.72 630.66,1034.02 U1.E5@631.06,1034.02
  Signal 1 w5: 478.58,1146 487.54,1146 506.93,1126.61 526.32,1126.61 535.35,1117.59 535.35,1110.65 535.45,1110.55 535.45,1107.8 545.94,1097.31 621.07,1097.31 630.78,1087.6 630.78,1065.91 v2(614.59,1049.72)
  Signal 1 w8: 478.58,1146 439.31,1146 383,1146 189,952 189,84 226,47 687,47 J5.6@755,115
M5_Z: J5.7 U1.C3 | length 2160.6
  Top Layer w8: v2(552.32,1112.72) U1.C3@568,1097.04
  Signal 1 w5: 504.96,1160.08 559.37,1160.08 559.82,1159.62 568.85,1150.59 568.85,1129.24 v2(552.32,1112.72)
  Signal 1 w8: 504.15,1160.27 442.02,1160.27 373.27,1160.27 175,962 175,80 221,34 774,34 J5.7@855,115
M6_A: J6.5 U1.J4 | length 1530.1
  Top Layer w8: v2(583.78,892.24) 583.78,892.3 599.48,907.99 U1.J4@599.57,907.99
  Signal 1 w5: 528,841.67 528,868 536.43,876.43 568,876.43 v2(583.78,892.24)
  Signal 1 w8: 528,841.67 528,732.09 738.09,522 1082,522 1202,402 1202,217 1223,196 1389,196 J6.5@1470,115
M6_B: J6.6 U1.J3 | length 1675.9
  Top Layer w8: v2(552.32,892.24) U1.J3@568.07,907.99 ; v2(1139,243) 1139,198 1151,186 1499,186 J6.6@1570,115
  Signal 1 w8: v2(552.32,892.24) 525.24,892.24 511,878 511,732.12 739.74,503.38 1082.62,503.38 1139,447 v2(1139,243)
M6_Z: J6.7 U1.J1 | length 3050.1
  Top Layer w8: v2(463,879) 463.73,879.73 475.56,879.73 503.89,908.06 U1.J1@505.01,908.06
  Signal 2 w8: v2(463,879) 451.81,867.81 203.55,867.81 43.67,867.81 7,831.14 7,99 97,9 1639,9 1670,40 J6.7@1670,115
MCU_RX: J9.3 U1.L14 | length 1593.1
  Top Layer w3: U1.L14@914.46,845.07 931.5,828.03 931.5,785.7 982.2,735 1438.85,735 1513.85,660 1551,622.85 1551,589.1 1814.87,325.23 1814.87,89.13 1858,46 1940,46 J9.3@1978,84
MCU_TX: J9.2 U1.K14 | length 1557.6
  Top Layer w3: U1.K14@914.53,876.5 939,852.02 939,788.1 985.1,742 1441.75,742 1559,624.75 1559,591 1821.87,328.13 1821.87,92.98 1856.04,58.82 1902.82,58.82 J9.2@1928,84
MOTOR_1+: J1.8 U6.8 | length 266.7
  Bottom Layer w16: J1.8@91,925 197,925 216,944 216,1008.47 214,1010.47 v1(214,1077)
  other v1: 214,1112.08 214,1147.15
MOTOR_1-: J1.1 U6.10
  other v1: 203.85,1418 238.92,1418 274,1418
MOTOR_1_B: U1.F2 U6.2 | length 329.1
  Top Layer w8: v2(526,1013) U1.F2@536.5,1002.55
  Bottom Layer w5: 433,1078 466.49,1078 472.49,1084 497,1084 515,1066 557.83,1066 567.73,1056.11 567.73,1011.48 558.38,1002.14 536.86,1002.14 v2(526,1013)
  Bottom Layer w8: U6.2@408.98,1131.83 408.98,1090.02 421,1078 433,1078
MOTOR_1_F: U1.F4 U6.1 | length 246
  Top Layer w8: v2@583.8,1018.23 U1.F4@599.5,1002.55
  Signal 1 w5: v2(451.97,1093.75) 451.97,1066.03 484.73,1033.27 570.74,1033.27 v2(583.78,1020.23)
  Bottom Layer w10: U6.1@434.57,1131.83 434.57,1111.16 v2(451.97,1093.75)
MOTOR_2+: J2.8 U10.8 | length 244.2
  Bottom Layer w15: 179,227 179,367 166.21,379.79 166.21,392.21 184.08,410.08 v1(232.5,410.08)
  other v1: 232.5,375 232.5,445.15
MOTOR_2-: J2.1 U10.10 | length 30.1
  Bottom Layer w10: v1(261.91,708) v1(292,708)
MOTOR_2_B: U1.G3 U10.2 | length 1157.8
  Top Layer w6: U1.G3@568,971.06 ccw(c568,976.14) 571.59,972.54 v2(583.78,984.73)
  Signal 1 w6: 532.59,967 538.96,967 556.69,984.73 v2(583.78,984.73)
  Signal 1 w8: 532.59,967 343,967 323,947 323,777 488.66,611.34 488.66,531.53 516.19,504 v2(574,504)
  Bottom Layer w8: U10.2@426.21,429.83 426.21,396.29 440.5,382 492.58,382 526.4,415.83 556.83,415.83 574,433 v2(574,504)
MOTOR_2_F: U1.G1 U10.1 | length 912.6
  Top Layer w8: v2(483.09,985.65) cw(c483.09,963.29) 492.49,983.58 cw(c483.09,963.29) 498.9,979.1 U1.G1@506,972
  Signal 1 w8: v2(483.09,985.65) 344.68,985.65 311,951.97 311,771 476.66,605.34 476.66,519.77 512.43,484 v2(545,484)
  Bottom Layer w8: U10.1@453.07,429.83 491.83,429.83 545,483 v2(545,484)
MOTOR_3+: J3.8 U12.8
  other v1: 766.85,1495 801.92,1495 837,1495
MOTOR_3-: J3.1 U12.10
  other v1: 538.5,1495 573.58,1495 608.65,1495
MOTOR_3_B: U1.B2 U12.2 | length 457.4
  Top Layer w8: v2(523.41,1143.38) 536.5,1130.28 U1.B2@536.5,1128.54 ; U12.2@782.17,1301.29 817.1,1301.29 826,1292.39 826,1249.18 v2(825.55,1248.73)
  Bottom Layer w8: v2(523.41,1143.38) 592.53,1212.5 789.32,1212.5 v2(825.55,1248.73)
MOTOR_3_F: U1.A4 U12.1 | length 252.7
  Top Layer w8: U1.A4@599.5,1160.03 599.5,1177.5 659.5,1237.5 766.5,1237.5 782.17,1253.17 U12.1@782.17,1274.43
MOTOR_4+: J4.8 U7.8
  other v1: 1566.85,1504 1601.92,1504 1637,1504
MOTOR_4-: J4.1 U7.10
  other v1: 1338.5,1504 1373.58,1504 1408.65,1504
MOTOR_4_B: U1.D2 U7.2 | length 1681.2
  Top Layer w8: v2(521.2,1081.59) U1.D2@536.5,1066.28 ; v2@923.08,1455.77 930.82,1463.51 982.52,1463.51 1012,1434.03 v2(1012,1384.54)
  Top Layer w10: U7.2@1582.17,1305.02 1612.15,1305.02 cw(c1612.15,1293.37) 1620.38,1301.62 1625.07,1296.93 ; v2(1605,1229) 1612,1236 ccw(c1573.38,1274.62) 1628,1274.62 1628,1289.86 ccw(c1618,1289.86) 1625.08,1296.92
  Signal 1 w8: v2(1012,1384.54) 1012,1295 1052,1255 1590,1255 1605,1240 v2(1605,1229)
  Signal 2 w8: v2(521.2,1081.59) 502,1100.79 502,1157.02 566.98,1222 757.03,1222 923,1387.97 v2(923,1455.69)
MOTOR_4_F: U1.D3 U7.1 | length 1219
  Top Layer w8: v2(552.32,1081.41) U1.D3@568,1065.73 ; v2(842.57,1178.59) v2(874.07,1178.59)
  Top Layer w10: v2(1582,1229) 1582.17,1229.17 U7.1@1582.17,1279.43
  Signal 1 w8: v2(874.07,1178.59) 894.47,1178.59 1085.59,1178.59 1150,1243 1568,1243 v2(1582,1229)
  Signal 2 w5: v2(552.32,1081.41) 536.92,1096.81 536.92,1119.1 545.94,1128.12 723.12,1128.12 742,1147
  Signal 2 w8: 742,1147 773.59,1178.59 809.07,1178.59 v2(842.57,1178.59)
MOTOR_5+: J5.8 U11.8
  other v1: 431.8,234 466.87,234 501.72,233.77
MOTOR_5-: J5.1 U11.10 | length 176.4
  Bottom Layer w12: 252,186 255,183 J5.1@255,115 ; 595,188 648.29,188 660.15,199.85 v1(660.15,234)
  other v1: 695.22,234 730.3,234
MOTOR_5_B: U1.C4 U11.2 | length 807.4
  Top Layer w8: U11.2@486.63,427.71 449.29,427.71 440.8,436.2 440.8,458.8 467.6,485.6 467.6,502.38 544.23,579.01 v2(544.23,602.76) ; v2(583.82,1112.72) U1.C4@599.5,1097.04 U1.C4@599.57,1096.97
  Signal 2 w5: 568,813.5 568,1096.9 v2(583.82,1112.72)
  Signal 2 w8: v2(544.23,602.76) 568,626.53 568,813.5
MOTOR_5_F: U1.D5 U11.1 | length 723.1
  Top Layer w8: U11.1@486.63,454.57 486.63,504.44 556.23,574.04 v2(571.96,589.78) ; U11.1@503,454.57 U11.1@507.3,454.57 ; v2(614.59,1081.22) 614.95,1081.22 630.67,1065.5 U1.D5@631.06,1065.5
  Top Layer w10: U11.1@486.63,454.57 U11.1@503,454.57
  Signal 2 w5: 600,813 599.19,813.81 599.19,1065.81 v2(614.59,1081.22)
  Signal 2 w8: v2(571.96,589.78) 599.81,617.62 599.81,812.19
MOTOR_6+: J6.8 U13.8
  other v1: 1248.8,239 1283.87,239 1318.95,239
MOTOR_6-: J6.1 U13.10 | length 532.7
  Bottom Layer w12: J6.1@1070,115 1070,176.69 cw(c1097.31,176.69) 1078,196 1483,196 1483,224.87 ccw(c1463.01,224.87) v1(1477.15,239)
  other v1: 1512.22,239 1547.3,239
MOTOR_6_B: U1.A7 U13.2 | length 1539.4
  Top Layer w8: v2(694,1160) v2(694,1160) ; v2(1267,542) 1267,510.28 1257.8,501.08 1257.8,445 1270.09,432.71 U13.2@1303.63,432.71
  Signal 1 w5: v2(694,1160) 694,1225 781,1312 v2(982.5,1312)
  Signal 2 w8: v2(1130.91,1298.41) 1130.91,629.07 1186.97,573 1236,573 v2(1267,542)
  Bottom Layer w8: v2@980,1312 v2(982.5,1312) 1117.31,1312 v2(1130.91,1298.41)
MOTOR_6_F: U1.B7 U13.1 | length 1532.7
  Top Layer w8: v2(678.31,1144.21) U1.B7@693.98,1128.54 U1.B7@694.06,1128.46 ; v2(1303,547) 1303.63,546.37 U13.1@1303.63,459.57
  Signal 1 w5: v2(678.31,1144.21) 692.52,1130 717.38,1130 726.4,1139.02 726.4,1151.79 726.4,1209.4 798.5,1281.5 v2(982.5,1281.5)
  Signal 2 w8: v2(1149.81,1281.5) 1149.81,627.13 1188.94,588 1263,588 1303,548 v2(1303,547)
  Bottom Layer w8: v2(982.5,1281.5) v2(1149.81,1281.5)
NetC1_2: C1.2 C2.2 FB1.2 U1.N6 U1.P6 | length 194.9
  Top Layer w8: FB1.2@540.44,689 C1.2@588,689 C2.2@628,689 662.56,723.56 662.56,750.51 U1.N6@662.56,782.01
NetC3_2: C3.2 C4.2 U1.P8 | length 103.6
  Top Layer w5: C3.2@666.64,689 C3.2@667.5,689
  Top Layer w8: C3.2@667.5,689 C4.2@699,689 ; C4.2@707,689 710.5,689 725.55,704.05 U1.P8@725.55,750.51
NetC5_2: C5.2 C6.2 U1.P10 | length 118
  Top Layer w8: U1.P10@788.47,750.58 805,734.06 v2(805,720.02)
  Bottom Layer w8: C5.2@735.5,738 769.7,738 778.5,738 C6.2@778.5,737.42 ; C6.2@775,737 791.98,720.02 v2(805,720.02)
NetC7_2: C7.2 U1.M10 | length 55.4
  Top Layer w8: U1.M10@788.47,813.57 788.47,812.67 v2(803.39,797.76)
  Bottom Layer w8: v2(803.39,797.76) 803.39,776.3 C7.2@815.29,776.3
NetC24_2: C24.2 C25.1 C26.2 C27.2 FB2.2 U1.L1 U1.L2
NetC28_2: C28.2 C29.1 C30.2 C31.2 C32.2 C33.2 C34.2 C35.2 C36.2 C37.2 C38.2 C41.2 L1.1 U1.F6 U1.F7 U1.F8 U1.F9 U1.G6 U1.G9 U1.H6 U1.H9 U1.J5 U1.J9 | length 319.1
  Top Layer w8: U1.J5@631.06,907.99 v2(646.81,923.74) 662.56,939.49 662.56,970.98 662.56,1002.48 694.06,1002.48 725.55,1002.48 757.05,1002.48 757.05,970.98 757.05,939.49 U1.J9@757.05,907.99 ; v2(741.3,1017.54) 741.64,1017.54 756.63,1002.55 U1.F9@756.98,1002.55
  Bottom Layer w3: 801.47,997.5 C34.2@801.97,998
  other v2: 282,906.34
NetC39_1: C39.1 U1.N11 X1.1 | length 377.3
  Top Layer w5: U1.N11@820.04,782.01 837,765.05 837,737 852.08,721.92 931.15,721.92 1009.62,643.68 1019.39,633.92 X1.1@1019.39,603.46 1088.46,603.46 C39.1@1089,604
NetC40_1: C40.1 U1.P11 X1.3 | length 299.5
  Top Layer w5: U1.P11@820.04,750.51 820.04,730.96 838.91,712.09 871.91,712.09 888,696 888,548 899.46,536.54 X1.3@932.77,536.54
NetC42_1: C42.1 U1.P9 X2.2 | length 101.7
  Top Layer w5: X2.2@757.05,648.8 U1.P9@757.05,750.51
NetC43_1: C43.1 U1.N9 X2.1 | length 213.6
  Top Layer w5: U1.N9@757.05,782.01 773,766.06 773,706 781,698 848,698 854.43,691.57 X2.1@854.43,648
NetC44_2: C44.2 C45.2 D7.1 U1.K8 | length 385
  Top Layer w8: U1.K8@725.55,876.5 v2(741.3,860.75)
  Signal 1 w8: v2(741.3,860.75) 823.43,942.88 v2(1070,942.88)
NetC54_1: C54.1 U6.13 | length 104.1
  Bottom Layer w10: U6.13@357.8,1360.17 357.8,1412.8 370.5,1425.5 C54.1@370.5,1459
NetC54_2: C54.2 U6.14 | length 108.8
  Bottom Layer w10: U6.14@383.39,1360.17 383.39,1398.39 407.5,1422.5 C54.2@407.5,1459
NetC55_1: C55.1 U7.13 | length 104.1
  Top Layer w10: C55.1@1255,1343.5 1288.5,1343.5 1301.2,1356.2 U7.13@1353.83,1356.2
NetC55_2: C55.2 U7.14 | length 108.8
  Top Layer w10: C55.2@1255,1306.5 1291.5,1306.5 1315.61,1330.61 U7.14@1353.83,1330.61
NetC56_2: C56.2 U6.12 | length 65.1
  Bottom Layer w10: U6.12@332,1360.38 C56.2@332,1425.5
NetC57_2: C57.2 U7.12 | length 65.1
  Top Layer w10: C57.2@1288.5,1382 U7.12@1353.62,1382
NetC58_1: C58.1 L2.1 U8.5
NetC58_2: C58.2 U8.6
NetC69_1: C69.1 U10.13 | length 104.1
  Bottom Layer w10: U10.13@376.3,658.17 376.3,710.8 389,723.5 C69.1@389,757
NetC69_2: C69.2 U10.14 | length 108.8
  Bottom Layer w10: U10.14@401.89,658.17 401.89,696.39 426,720.5 C69.2@426,757
NetC70_1: C70.1 U11.13 | length 106.2
  Top Layer w10: U11.13@714.97,377.8 767.59,377.8 785.3,395.5 C70.1@813.8,395.5
NetC70_2: C70.2 U11.14 | length 110.9
  Top Layer w10: U11.14@714.97,403.39 753.19,403.39 782.3,432.5 C70.2@813.8,432.5
NetC71_2: C71.2 U10.12 | length 65.1
  Bottom Layer w10: U10.12@350.5,658.38 C71.2@350.5,723.5
NetC72_2: C72.2 U11.12 | length 65.1
  Top Layer w10: U11.12@715.18,352 C72.2@780.3,352
NetC77_1: C77.1 U12.13 | length 104.1
  Top Layer w10: C77.1@455,1338.5 488.5,1338.5 501.2,1351.2 U12.13@553.83,1351.2
NetC77_2: C77.2 U12.14 | length 108.8
  Top Layer w10: C77.2@455,1301.5 491.5,1301.5 515.61,1325.61 U12.14@553.83,1325.61
NetC78_1: C78.1 U13.13 | length 104.1
  Top Layer w10: U13.13@1531.97,382.8 1584.59,382.8 1597.3,395.5 C78.1@1630.8,395.5
NetC78_2: C78.2 U13.14 | length 108.8
  Top Layer w10: U13.14@1531.97,408.39 1570.19,408.39 1594.3,432.5 C78.2@1630.8,432.5
NetC79_2: C79.2 U12.12 | length 65.1
  Top Layer w10: C79.2@488.5,1377 U12.12@553.62,1377
NetC80_2: C80.2 U13.12 | length 65.1
  Top Layer w10: U13.12@1532.18,357 C80.2@1597.3,357
NetC81_1: C81.1 U15.7 | length 59.7
  Bottom Layer w8: U15.7@1315.23,976.41 1373,976.41 C81.1@1373,974.5
NetC85_1: C85.1 R43.1 U15.1
NetD8_1: D8.1 L3.1 Q4.1 Q4.2 Q4.3
NetF1_2: F1.2 FB1.1
NetL1_2: L1.2 U1.M1 U1.M2 | length 190.4
  Top Layer w12: v2(458.74,813.5) U1.M1@500.08,813.5 ; U1.M1@505.08,813.5 U1.M2@536.57,813.5
  Bottom Layer w12: L1.2@422.91,905 422.91,830.09 439.5,813.5 v2(458.74,813.5)
NetLED1_2: LED1.2 R25.2
NetQ1_1: Q1.1 Q2.3 R9.2
NetQ2_1: Q2.1 R10.2 R18.2
NetQ3_1: Q3.1 R26.2 R32.1
NetQ3_3: Q3.3 R25.1
NetQ4_4: Q4.4 U15.6 | length 526.5
  Signal 1 w8: v2(1657,1060) v2(1790.19,1060)
  Bottom Layer w5: U15.6@1315.23,1002 1353.2,1002 1385.7,1034.5 1566.76,1034.5 1631.5,1034.5 v2(1657,1060)
  Bottom Layer w12: Q4.4@1778,1037.67 1778,1047.81 v2@1790.3,1060.11
NetQ4_5: Q4.5 Q4.6 Q4.7 Q4.8 R41.1 U15.5 | length 39.2
  Bottom Layer w8: U15.5@1315.23,1027.59 1318.64,1031 v2(1353,1031)
NetR2_2: R2.2 U1.K3 | length 86.3
  Top Layer w8: v2(552.32,860.75) U1.K3@568.07,876.5
  Bottom Layer w5: v2(552.32,860.75) 567.73,845.34 567.73,812.5 561.23,806 R2.2@561,806
NetR3_1: R3.1 U6.7 | length 95.8
  Bottom Layer w10: R3.1@281.02,1036 U6.7@281.02,1131.83
NetR4_1: R4.1 U7.7 | length 95.8
  Top Layer w10: U7.7@1582.17,1432.98 R4.1@1678,1433
NetR5_1: R5.1 U6.6 | length 102.8
  Bottom Layer w10: U6.6@306.61,1131.83 306.61,1068.39 321,1054 R5.1@321,1035
NetR6_1: R6.1 U7.6 | length 102.8
  Top Layer w10: U7.6@1582.17,1407.39 1645.61,1407.39 1660,1393 R6.1@1679,1393
NetR15_1: R15.1 U10.7 | length 95.8
  Bottom Layer w10: R15.1@299.52,334 U10.7@299.52,429.83
NetR16_1: R16.1 U11.7 | length 100.4
  Top Layer w10: R16.1@391.83,287.55 405.3,301.02 U11.7@486.63,301.02
NetR17_1: R17.1 U10.6 | length 102.8
  Bottom Layer w10: U10.6@325.11,429.83 325.11,366.39 339.5,352 R17.1@339.5,333
NetR19_1: R19.1 U11.6 | length 99.1
  Top Layer w10: R19.1@389.8,322 389.8,322.61 393.8,326.61 U11.6@486.63,326.61
NetR33_1: R33.1 U12.7 | length 95.8
  Top Layer w10: U12.7@782.17,1427.98 R33.1@878,1427.98